# Altium PCB OFP_VIM_v1.5.2.PcbDoc (part 3 of 3)
Units mil, origin at the board's own origin, x right, y up, seen from the top; angles counter-clockwise.
Board outline 4311.02 x 2539.37 mil, 2 copper layers (Top Layer, Bottom Layer), stack 62.256 mil thick; 96 components, 59 nets, 240 pads, 33 vias.
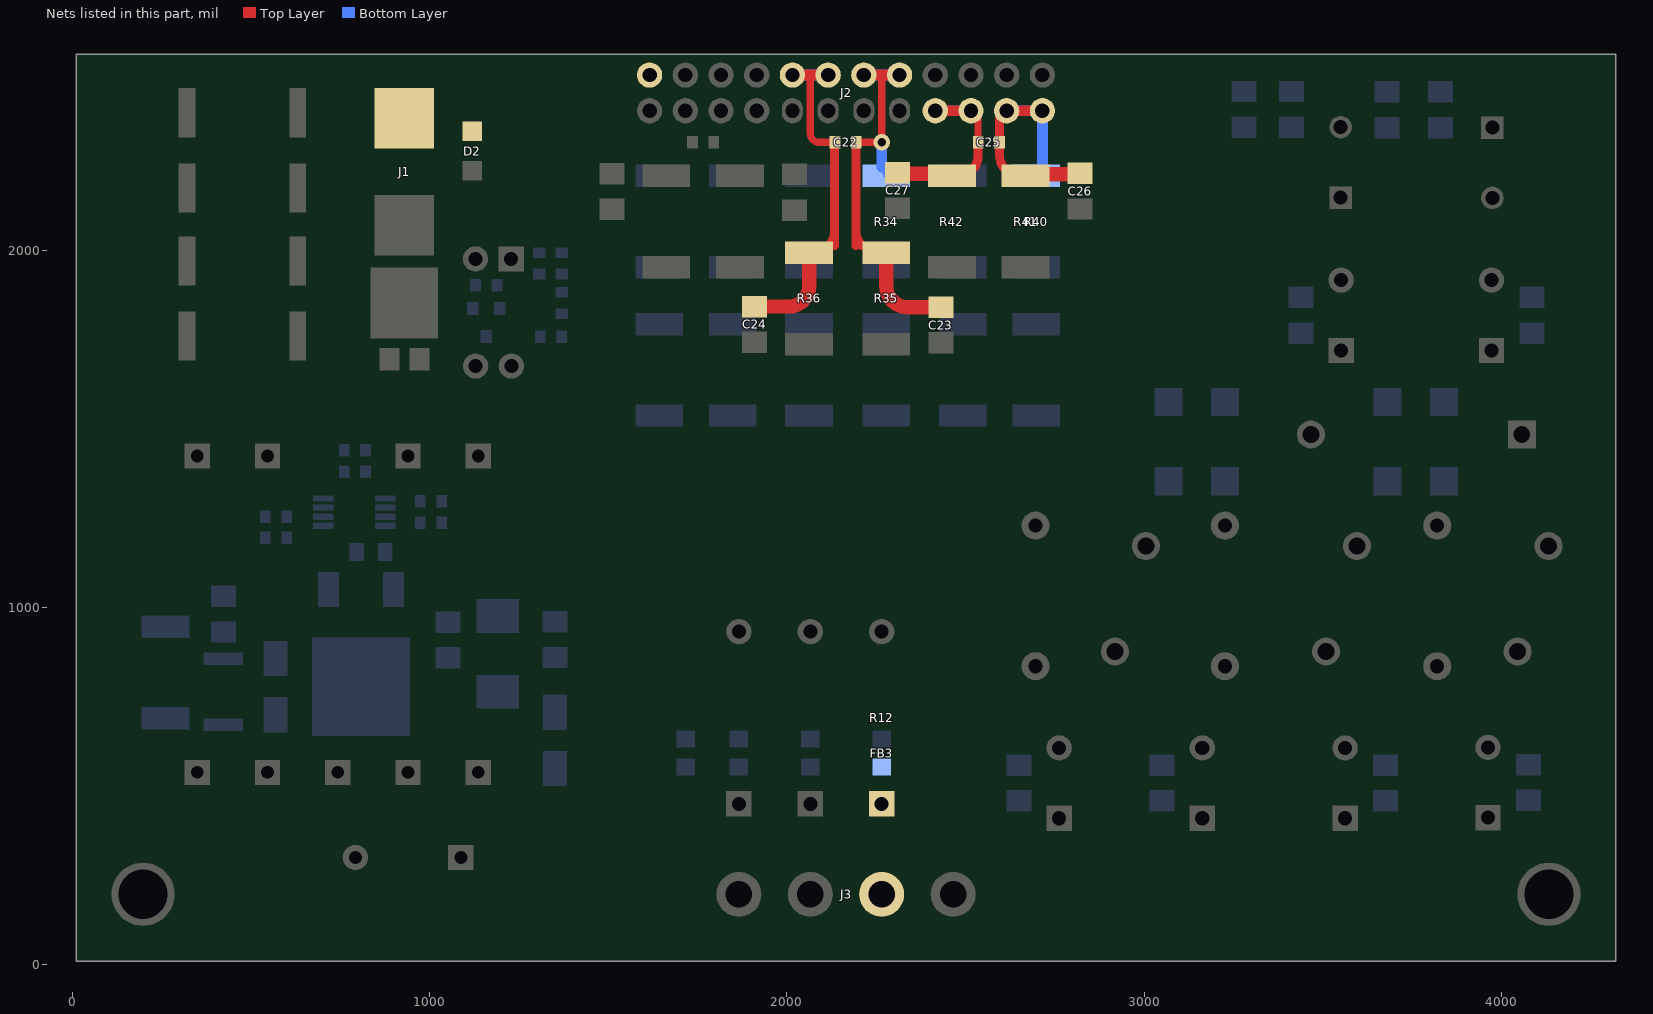
[diagram p2: the nets of this part, all layers, seen from the top]

## Via types
v1: diameter 47.24, hole 23.62, Top Layer to Bottom Layer, 33 vias

## Nets (pads, with @x,y where several pads share a name; then routed paths per layer and width w, separated by ;. In a path a pad name is that pad's centre, name@x,y a point inside that pad or via, vN(x,y) a via of type N, cw(c..) or ccw(c..) an arc to the next point about the centre after c; other vN are vias at no path point) (continued)
VB_N: C22.2 C24.2 J2.13 J2.15 R36.2 | length 1113.1
  Top Layer w20: 2065.35,2490.95 2065.35,2327.58 ccw(c2090.3,2327.58) 2090.3,2302.64 C22.2@2134.36,2302.64
  Top Layer w25: R36.2@2061.19,1996.69 2117.39,2013.77 ccw(c2076.35,2053.77) 2133.65,2053.77 ; 2133.65,2013.77 C22.2@2133.65,2300.93
  Top Layer w30: J2.15@2015.35,2490.95 2065.35,2490.95 J2.13@2115.35,2490.95
  Top Layer w40: C24.2@1909.8,1842.69 2005.78,1842.69 ; 2008.39,1842.75 ccw(c2005.78,1899.07) 2062.16,1899.07 R36.2@2062.16,1993.49
  Bottom Layer w30: J2.15@2015.35,2490.95 J2.13@2115.35,2490.95
VB_P: C22.1 C23.2 J2.9 J2.11 R34.2 R35.2 | length 1227.4
  Top Layer w20: C22.1@2194.36,2302.64 2263.65,2302.64 2264.13,2302.67 cw(c2265.35,2282.71) 2265.35,2302.71 2265.35,2490.95
  Top Layer w25: 2193.65,2013.77 C22.1@2193.65,2300.93 ; 2193.65,2053.77 ccw(c2250.96,2053.77) 2209.92,2013.77 R35.2@2266.85,1996.47
  Top Layer w30: J2.11@2215.35,2490.95 2265.35,2490.95 J2.9@2315.35,2490.95
  Top Layer w40: R35.2@2278.16,1993.49 2278.16,1900 ccw(c2337.31,1900) 2337.31,1840.85 C23.2@2430.83,1840.85
  Bottom Layer w15: R34.2@2265.35,2232.49 R34.2@2278.16,2208.5
  Bottom Layer w30: J2.11@2215.35,2490.95 J2.9@2315.35,2490.95 ; R34.2@2265.35,2232.49 v1(2265.35,2302.64)
VC_INPUT: FB3.1 J3.3 R12.1
VC_N: C25.2 C27.2 J2.6 J2.8 R42.2 | length 586.4
  Top Layer w20: J2.6@2515.35,2390.95 cw(c2515.35,2370.95) 2535.35,2370.95 C25.2@2535.35,2302.65
  Top Layer w25: R42.2@2462.16,2208.5 2519.09,2225.8 ccw(c2478.05,2265.8) 2535.35,2265.8 C25.2@2535.35,2302.65
  Top Layer w30: J2.8@2415.35,2390.95 J2.6@2515.35,2390.95
  Top Layer w40: C27.2@2309.77,2214.78 R42.2@2455.87,2214.78
  Bottom Layer w30: J2.8@2415.35,2390.95 J2.6@2515.35,2390.95
VC_P: C25.1 C26.2 J2.2 J2.4 R40.2 R41.2 | length 885.3
  Top Layer w20: C25.1@2595.35,2302.65 2595.35,2370.95 cw(c2615.35,2370.95) J2.4@2615.35,2390.95
  Top Layer w25: J2.4@2615.35,2390.95 ccw(c2615.35,2370.95) 2595.35,2370.95 2595.35,2265.8 ccw(c2652.66,2265.8) 2611.62,2225.8 R41.2@2668.55,2208.49
  Top Layer w30: J2.4@2615.35,2390.95 J2.2@2715.35,2390.95
  Top Layer w40: R41.2@2674.76,2212.88 C26.2@2820.86,2212.88
  Bottom Layer w30: J2.4@2620,2390.95 J2.2@2715.35,2390.95 ; R40.2@2682.55,2208.49 2715.35,2232.49 J2.2@2715.35,2390.95 ; J2.2@2720,2390.95 J2.2@2715.35,2390.95
VIN+: D2.2 J1.2 J2.23
pads on no net: J2.5 J2.7 J2.10 J2.14 J2.16 J2.17 J2.19 T1.2 T1.6 T1.10

## Polygon pours and split planes (outlines as drawn)
NetBR1_4 on Bottom Layer "NETBR1_4_L02_P053" (solid, pour order 53): 3367.65,1539.84 cw(c3393.87,1539.84) 3393.87,1566.07 3520.48,1566.07 ccw(c3520.48,1591.16) 3545.57,1591.16 3545.57,1602.76 ccw(c3518.33,1602.76) 3518.33,1630 3202.05,1630 ccw(c3202.05,1614.7) 3186.76,1614.7 3186.76,1510 ccw(c3206.21,1510) 3206.21,1490.55 3351.14,1490.55 ccw(c3351.14,1507.06) 3367.65,1507.06
NGND on Bottom Layer "NGND_L02_P051" (solid, pour order 51): 2250.79,2173.86 ccw(c2276.94,2173.86) 2276.94,2147.7 2418.13,2147.7 cw(c2418.13,2116.03) 2449.81,2116.03 2449.81,2044.73 cw(c2419.16,2044.73) 2419.16,2014.09 2179.1,2014.09 cw(c2179.85,2058.78) 2135.16,2059.53 2135.16,2403.16 cw(c2166,2403.16) 2166,2434 2213.64,2434 cw(c2213.64,2396.85) 2250.79,2396.85
NGND on Bottom Layer "NGND_L02_P050" (solid, pour order 50): 2601.25,2531.46 ccw(c2601.25,2510.14) 2579.92,2510.14 2579.92,2476.58 ccw(c2605.08,2476.58) 2605.08,2451.42 2778.58,2451.42 cw(c2778.58,2432.84) 2797.16,2432.84 2797.16,1812.84 ccw(c2816.51,1812.84) 2816.51,1793.49 2867.8,1793.49 ccw(c2867.8,1815.69) 2890,1815.69 2890,2506 ccw(c2864.54,2506) 2864.54,2531.46
GND on Bottom Layer "GND_L02_P044" (solid, pour order 44): 1050.93,1380 ccw(c1050.93,1399.55) 1070.48,1399.55 1070.48,1486.48 cw(c1086,1486.48) 1086,1502 1188.78,1502 cw(c1188.78,1489.43) 1201.35,1489.43 1201.35,1397.65 ccw(c1219.5,1398.15) 1220,1380 1360,1380 ccw(c1360,1406.63) 1386.63,1406.63 1386.63,2150 ccw(c1335.26,2150) 1335.25,2201.38 922.94,2201.38 cw(c922.94,2247.94) 876.38,2247.94 876.38,2262.06 cw(c924.32,2262.06) 924.32,2310 1616.22,2310 ccw(c1616.22,2344.57) 1650.79,2344.57 1650.79,2390.95 ccw(c1615.36,2390.95) 1615.35,2426.38 cw(c1615.35,2469.22) 1585.06,2438.93 1561.87,2462.12 cw(c1615.36,2484.27) 1557.46,2484.27 1557.46,2513.1 cw(c1584.36,2513.1) 1584.36,2540 30,2540 30,666.26 30,366.25 ccw(c66.25,366.25) 66.25,330 397.3,330 cw(c397.3,287.3) 440,287.3 440,236.85 ccw(c480,236.85) 480,196.85 771.26,196.85 ccw(c771.26,243.44) 817.85,243.44 817.85,405.36 ccw(c783.21,405.37) 783.21,440 223.94,440 cw(c223.94,513.65) 150.29,513.65 150.29,1477.14 cw(c203.2,1477.14) 150.35,1479.73 150.36,1500.36 cw(c200,1500.36) 200,1550 856.76,1550 cw(c856.76,1515.63) 891.14,1515.62 891.14,1380
NetC7_2 on Bottom Layer "NETC7_2_L02_P040" (solid, pour order 40): 385.39,963.35 ccw(c385.39,941.82) 363.85,941.82 363.85,794.65 ccw(c383.88,794.65) 383.88,774.63 458,774.63 ccw(c458,794.64) 478,794.64 478,943.53 ccw(c458.18,943.53) 458.18,963.35
NetQ1_3 on Bottom Layer "NETQ1_3_L02_P043" (solid, pour order 43): 1055.12,1099.37 cw(c1055.12,1053.54) 1100.94,1053.54 1100.94,956.64 cw(c1073.36,956.64) 1073.36,929.06 1016,929.06 cw(c1016,947.69) 997.36,947.69 997.36,976.3 ccw(c972.71,976.3) 972.71,1000.95 855,1000.95 cw(c855,1015.95) 840,1015.95 840,1085 cw(c854.37,1085) 854.37,1099.37
NetD4_1 on Bottom Layer "NETD4_1_L02_P042" (solid, pour order 42): 1319.79,891 ccw(c1319.79,868.21) 1297,868.21 1297,669.54 ccw(c1321.54,669.54) 1321.54,645 1427.23,645 ccw(c1427.23,670) 1452.23,670 1452.23,865.06 ccw(c1426.29,865.06) 1426.29,891
NetC13_1 on Bottom Layer "NETC13_1_L02_P041" (solid, pour order 41): 1130.94,929.06 1130.94,1063.7 cw(c1164.85,1063.7) 1164.85,1097.61 1427.39,1097.61 cw(c1427.39,1065) 1460,1065 1460,959.06 cw(c1430,959.05) 1430,929.06 1257.5,929.06
NetC7_1 on Bottom Layer "NETC7_1_L02_P039" (solid, pour order 39): 207.11,1080 ccw(c207.11,1052.89) 180,1052.89 180,900.72 ccw(c210.72,900.72) 210.72,870 309.75,870 ccw(c309.75,893.25) 333,893.25 333,972.19 cw(c360.81,972.19) 360.81,1000 411.05,1000 478.89,1000 cw(c478.89,960.35) 518.53,960.35 518.54,824.68 ccw(c538.2,824.68) 538.2,805.01 596.77,805.01 ccw(c596.78,822.24) 614,822.24 614,1040 ccw(c574,1040) 574,1080
NetD3_2 on Bottom Layer "NETD3_2_L02_P034" (solid, pour order 34): 579.58,775 549.65,775 ccw(c549.65,743.88) 518.54,743.88 518.54,647.18 ccw(c544.54,648) 545.37,622 606,622 cw(c606,599) 629,599 629,514 ccw(c661,514) 661,482 789,482 ccw(c789,512) 819,512 819,577.82 cw(c854.09,577.91) 854,613 938,613 ccw(c938,641) 966,641 966,895.29 ccw(c924.29,895.29) 924.29,937 689,937 ccw(c689,902) 654,902 654,801 cw(c628,801) 628,775
100VDC-623VDC on Bottom Layer "100VDC-623VDC_L02_P038" (solid, pour order 38): 218.66,743.88 ccw(c218.66,705.19) 179.97,705.19 179.97,522.78 ccw(c212.75,522.78) 212.75,490 440,490 ccw(c440,529.76) 479.76,529.76 479.76,710.93 ccw(c446.81,710.93) 446.81,743.88
PGND on Bottom Layer "PGND_L02_P036" (solid, pour order 36): 1264,285.46 cw(c1239.71,285.46) 1239.71,261.17 1062.92,261.17 cw(c1062.92,284.42) 1039.68,284.42 1039.68,601.86 ccw(c1019.43,601.86) 1019.43,622.11 cw(c1021.82,650.12) 1019.06,622.14 cw(c1018.98,644.87) 996.26,644.79 996.26,862.28 cw(c1024.98,862.28) 1024.98,891 1234,891 cw(c1234,861) 1264,861
NetD4_2 on Bottom Layer "NETD4_2_L02_P035" (solid, pour order 35): 896.51,583 ccw(c896.51,553.32) 866.84,553.32 866.84,158.37 ccw(c910.2,158.37) 910.2,115 1417,115 ccw(c1417,153.78) 1455.78,153.78 1455.78,583.8 ccw(c1424.58,583.8) 1424.58,615 1331.04,615 ccw(c1331.04,580.96) 1297,580.96 1297,252 cw(c1267,252) 1267,222 1039.68,222 cw(c1039.68,258.24) 1003.44,258.24 1003.44,553.32 ccw(c973.76,553.32) 973.76,583 921.37,583
NetBR1_1 on Bottom Layer "NETBR1_1_L02_P015" (solid, pour order 15): 3000,1508.37 ccw(c3017.82,1508.37) 3017.82,1490.55 3100.54,1490.55 ccw(c3100.54,1510) 3119.99,1510 3119.5,1590.76 3119.5,1639.5 cw(c3145.43,1639.5) 3145.43,1665.43 3235.71,1665.43 3591.56,1665.43 cw(c3591.56,1637.12) 3619.86,1637.12 3619.86,1549.4 cw(c3596.59,1549.4) 3596.59,1526.12 3427.85,1526.12 ccw(c3427.85,1506.44) 3408.17,1506.44 3408.17,1472.28 ccw(c3435.41,1472.28) 3435.41,1445.04 3682.62,1445.04 ccw(c3682.62,1483.88) 3721.46,1483.88 3721.46,1650.99 3721.46,1766.44 ccw(c3689.76,1766.45) 3689.76,1798.15 3038.15,1798.15 ccw(c3038.14,1760) 3000,1760
NetR10_1 on Bottom Layer "NETR10_1_L02_P026" (solid, pour order 26): 3229.32,2478.06 3229.32,2503.61 cw(c3245.27,2503.61) 3245.27,2519.56 3465.35,2519.56 cw(c3465.35,2505.6) 3479.32,2505.6 3479.32,2429.25 cw(c3462.91,2429.25) 3462.91,2412.85 3246.8,2412.85 cw(c3246.8,2430.33) 3229.32,2430.33
NetC2_2 on Bottom Layer "NETC2_2_L02_P024" (solid, pour order 24): 3357.81,2311.64 3357.81,2295.43 ccw(c3383.11,2295.43) 3383.11,2270.14 3587.05,2270.14 ccw(c3587.05,2290.89) 3607.81,2290.89 3607.81,2350.14 ccw(c3581.09,2350.14) 3581.09,2376.85 3381.51,2376.85 ccw(c3381.51,2353.15) 3357.81,2353.15
NetR4_1 on Bottom Layer "NETR4_1_L02_P023" (solid, pour order 23): 3629.4,2477.06 3629.4,2502.61 cw(c3645.36,2502.61) 3645.36,2518.56 3865.44,2518.56 cw(c3865.44,2504.6) 3879.4,2504.6 3879.4,2428.25 cw(c3863,2428.25) 3863,2411.85 3646.89,2411.85 cw(c3646.89,2429.33) 3629.4,2429.33
NetC2_2 on Bottom Layer "NETC2_2_L02_P022" (solid, pour order 22): 3774.32,2310.64 3774.32,2294.43 ccw(c3799.62,2294.43) 3799.62,2269.13 4003.56,2269.13 ccw(c4003.56,2289.89) 4024.32,2289.89 4024.32,2349.13 ccw(c3997.6,2349.13) 3997.6,2375.85 3798.02,2375.85 ccw(c3798.02,2352.14) 3774.32,2352.14
100VDC-623VDC on Bottom Layer "100VDC-623VDC_L02_P014" (solid, pour order 14): 3367.65,1905.35 3367.65,1858.85 ccw(c3388.35,1858.85) 3388.35,1838.14 3698.14,1838.14 ccw(c3698.14,1861.46) 3721.46,1861.46 3721.46,2367.48 ccw(c3713.09,2367.48) 3713.09,2375.85 3649.38,2375.85 ccw(c3649.38,2366.47) 3640,2366.47 3640,2246.59 cw(c3615.41,2246.58) 3615.41,2222 3519.16,2222 ccw(c3519.16,2193.98) 3491.14,2193.98 3491.14,2006.14 cw(c3457.86,2006.14) 3457.86,1972.86 3393.65,1972.86 ccw(c3393.64,1946.86) 3367.65,1946.86
PGND on Bottom Layer "PGND_L02_P013" (solid, pour order 13): 4064.76,1970.86 cw(c4064.76,1995.62) 4040,1995.62 4040,2192.63 ccw(c4012.63,2192.63) 4012.63,2220 3934.35,2220 ccw(c3934.35,2193) 3907.35,2193 3907.35,1906.16 3907.35,1864.86 ccw(c3934.06,1864.86) 3934.06,1838.14 4133.64,1838.14 ccw(c4133.64,1861.85) 4157.35,1861.85 4157.35,1944.86 ccw(c4131.35,1944.86) 4131.35,1970.86
NetBR1_4 on Bottom Layer "NETBR1_4_L02_P016" (solid, pour order 16): 3907.35,1654.35 cw(c3891,1654.35) 3891,1638 3823.49,1638 ccw(c3823.49,1614.7) 3800.2,1614.7 3800.2,1535.8 ccw(c3816,1535.8) 3816,1520 3971,1520 cw(c3971,1495) 3996,1495 3996,1447 ccw(c4017,1447) 4017,1426 4135,1426 ccw(c4135,1448.35) 4157.35,1448.35 4157.35,1582.84 4157.35,1732.93 4157.35,1774.44 ccw(c4133.64,1774.44) 4133.64,1798.14 3934.06,1798.14 ccw(c3934.06,1771.43) 3907.35,1771.43
NetBR2_3 on Bottom Layer "NETBR2_3_L02_P001" (solid, pour order 1): 2525,1290 ccw(c2525,1247) 2482,1247 2482,575.13 ccw(c2529.1,575.38) 2529.35,528.28 2801.28,528.28 ccw(c2801.29,555) 2828,555 2828,666.47 ccw(c2796.48,666.48) 2796.47,698 2657,698 cw(c2657,746) 2609,746 2609,1050.9 cw(c2647.1,1050.9) 2647.1,1089 2716.36,1089 ccw(c2716.36,1132.64) 2760,1132.64 2760,1257.03 ccw(c2727.03,1257.03) 2727.03,1290
NetBR1_2 on Bottom Layer "NETBR1_2_L02_P006" (solid, pour order 6): 3607,793.89 3607,728.78 ccw(c3641,728.78) 3641,694.78 3723.22,694.78 cw(c3723.22,670.65) 3747.35,670.65 3747.35,551.99 cw(c3723.65,551.99) 3723.64,528.28 3462.63,528.28 cw(c3462.63,557.45) 3433.46,557.46 3433.46,748.13 ccw(c3405.15,748.13) 3405.15,776.44 3178.19,776.44 cw(c3178.19,810.63) 3144,810.63 3144,899.86 cw(c3186.75,899.86) 3186.76,942.62 3557.38,942.62 cw(c3557.39,893) 3607,893
NetL1_1 on Bottom Layer "NETL1_1_L02_P010" (solid, pour order 10): 3924.07,489.86 ccw(c3924.07,463.14) 3897.35,463.14 3897.35,380.54 ccw(c3920.75,380.54) 3920.75,357.14 4121.35,357.14 ccw(c4121.35,383.14) 4147.35,383.14 4147.35,466.15 ccw(c4123.65,466.15) 4123.64,489.86
NetL3_1 on Bottom Layer "NETL3_1_L02_P009" (solid, pour order 9): 3460.18,488.29 ccw(c3460.18,461.57) 3433.46,461.57 3433.46,388.74 ccw(c3466.63,388.74) 3466.63,355.57 3721.35,355.57 ccw(c3721.35,381.57) 3747.35,381.57 3747.35,464.58 ccw(c3723.65,464.58) 3723.64,488.29
NetL5_1 on Bottom Layer "NETL5_1_L02_P008" (solid, pour order 8): 2959.37,488.29 ccw(c2959.37,462.39) 2933.47,462.39 2933.47,389.89 ccw(c2967.8,389.89) 2967.8,355.57 3104.94,355.57 3205.24,355.57 ccw(c3205.24,378.97) 3228.65,378.97 3228.65,461.57 ccw(c3201.93,461.57) 3201.93,488.29
NetBR1_3 on Bottom Layer "NETBR1_3_L02_P007" (solid, pour order 7): 3693.65,811.48 ccw(c3728.69,811.48) 3728.69,776.44 3868.14,776.44 cw(c3868.14,748.86) 3895.72,748.86 3895.72,558.2 ccw(c3924.07,558.2) 3924.07,529.86 4123.64,529.86 ccw(c4123.65,553.56) 4147.35,553.56 4147.35,636.57 4147.35,898.65 ccw(c4103.88,898.65) 4103.88,942.12 3735.49,942.12 ccw(c3735.49,900.28) 3693.65,900.28
NEUTRAL on Bottom Layer "NEUTRAL_L02_P000" (solid, pour order 0): 1670.06,349.66 ccw(c1703.14,349.66) 1703.14,316.58 2352.21,316.58 cw(c2352.21,275.59) 2393.21,275.59 2393.21,112.2 ccw(c2433.97,112.78) 2434.54,72.02 2779.7,72.02 ccw(c2779.69,104.33) 2812,104.33 2812,305.64 2812,455 ccw(c2778.72,455) 2778.72,488.28 2714.54,488.28 2520.28,488.28 ccw(c2520.28,450) 2482,450 2482,392 cw(c2449.07,392) 2449.07,359.07 1789.26,359.07 cw(c1789.26,383.32) 1765,383.32 1765,555 ccw(c1743.38,555) 1743.38,576.62 1690.88,576.62 ccw(c1690.88,555.81) 1670.06,555.81
NetL1_1 on Top Layer "NETL1_1_L01_P058" (solid, pour order 58): 2684.95,331.05 ccw(c2741.29,331.05) 2741.29,274.71 3730.71,274.71 ccw(c3730.71,307.35) 3763.35,307.35 3763.35,379.58 3763.35,475.64 cw(c3796,475.64) 3796,508.29 4021.43,508.29 cw(c4021.43,473.71) 4056,473.71 4056,400 cw(c4019.19,400) 4019.19,363.19 3957.59,363.19 ccw(c3957.59,321.59) 3916,321.59 3916,160 cw(c3872.82,160) 3872.82,116.82 2659.18,116.82 cw(c2659.18,172.05) 2603.95,172.05 2603.95,226.62 ccw(c2510.57,226.62) 2510.57,320 2456,320 cw(c2456,357.79) 2418.21,357.79 2418.21,498.27 ccw(c2376.49,498.27) 2376.48,540 1841.4,540 cw(c1841.4,585.4) 1796,585.4 1796,954.57 cw(c1826,954.57) 1826,984.57 1916,984.57 cw(c1916.01,954.57) 1946,954.57 1946,884.57 1946,670 ccw(c1996,670) 1996,620 2629.26,620 cw(c2629.26,564.31) 2684.95,564.31
GND on Top Layer "GND_L01_P032" (solid, pour order 32): 260.02,1707.65 ccw(c286.69,1707.65) 286.69,1680.98 675.04,1680.98 ccw(c674.99,1709.95) 703.96,1710 703.96,1819.06 ccw(c673.68,1820) 674.62,1850.28 286.69,1850.28 ccw(c286.69,1823.61) 260.02,1823.61
NGND on Top Layer "NGND_L01_P049" (solid, pour order 49): 1479.15,2146.6 ccw(c1479.15,2114.78) 1447.32,2114.78 1447.33,1758.08 ccw(c1499.31,1758.08) 1499.31,1706.09 2329.09,1706.09 2329.09,1769.08 ccw(c2327.34,1769.09) 2327.32,1770.84 2268.34,1770.05 cw(c2278.15,1819.23) 2263.59,1771.24 cw(c2263.59,1806.87) 2227.97,1806.87 2227.97,1898.23 ccw(c2202.23,1898.23) 2202.22,1923.97 2145,1923.97 ccw(c2144.98,1895.72) 2116.73,1895.73 2116.73,1807.43 cw(c2081.99,1807.43) 2081.99,1772.69 1828.21,1772.69 cw(c1828.21,1796.17) 1804.73,1796.18 1804.73,1880.41 cw(c1827.32,1880.41) 1827.33,1903 1915.28,1903 ccw(c1915.29,1922.88) 1935.16,1922.89 1935.16,2034.39 cw(c1955.76,2034.39) 1955.77,2054.99 2056.17,2054.99 ccw(c2056.17,2086.62) 2087.81,2086.63 2087.81,2116.62 ccw(c2057.82,2116.62) 2057.82,2146.6
100VDC-623VDC on Top Layer "100VDC-623VDC_L01_P047" (solid, pour order 47): 259.49,397.83 ccw(c300,397.83) 300,357.32 403.32,357.32 cw(c403.32,320.19) 440,314.42 440,109 ccw(c480,109) 480,69 1599.35,69 ccw(c1599.35,169) 1699.35,169 1699.35,1293.95 cw(c1755.6,1293.95) 1699.42,1296.71 cw(c1736.49,1296.71) 1736.49,1333.78 3313.78,1333.78 ccw(c3313.78,1387.64) 3367.64,1387.64 3367.65,1776.65 cw(c3408.14,1776.65) 3408.14,1817.14 3640,1817.14 ccw(c3640,1847.14) 3670,1847.14 3670,1930.63 ccw(c3636.39,1930.63) 3636.38,1964.24 3455.81,1964.24 3317.69,1964.24 ccw(c3317.69,1890) 3243.45,1890 3243.45,1468.45 cw(c3190,1468.45) 3190,1415 1655.19,1415 ccw(c1655.19,1356.17) 1596.36,1356.17 1596.36,255.36 cw(c1520,255.36) 1520,179 666.85,179 cw(c666.85,220.22) 625.63,220.22 625.63,420.16 ccw(c596.29,420.16) 596.29,449.5 460.68,449.5 cw(c460.68,480.18) 430,480.18 430,490 430,559 ccw(c400,559) 400,589 290,589 ccw(c290,558.49) 259.49,558.49
NetC2_2 on Top Layer "NETC2_2_L01_P017" (solid, pour order 17): 4118.01,2242.81 ccw(c4118.01,2275.21) 4150.41,2275.21 4150.41,2395.31 ccw(c4112.9,2395.31) 4112.9,2432.81 3514.62,2432.81 3454.62,2432.81 ccw(c3454.62,2392.81) 3414.62,2392.81 3414.62,2275.48 ccw(c3447.28,2275.48) 3447.28,2242.81
NetBR1_4 on Top Layer "NETBR1_4_L01_P052" (solid, pour order 52): 3907.35,1765 3790,1765 ccw(c3790,1745) 3770,1745 3770,1660 cw(c3750,1660) 3750,1640 3665,1640 3426.15,1640 ccw(c3426.14,1622.02) 3408.17,1622.02 3408.17,1580.71 ccw(c3428.88,1580.71) 3428.88,1560 3965,1560 cw(c3965,1536.32) 3988.68,1536.32 3988.68,1458.1 ccw(c4014.63,1458.1) 4014.63,1432.15 4127.15,1432.15 ccw(c4127.15,1455.41) 4150.41,1455.41 4150.41,1741.31 ccw(c4126.71,1741.31) 4126.71,1765
NGND on Top Layer "NGND_L01_P048" (solid, pour order 48): 2236.52,2119.53 cw(c2263.99,2119.53) 2263.99,2147 2845.83,2147 cw(c2845.83,2115.83) 2877,2115.83 2877,1752 cw(c2831.09,1752) 2831.09,1706.09 1995.23,1706.09 1995.23,1769.08 cw(c1997.01,1769.08) 1997.01,1770.85 2498,1770.85 ccw(c2498,1792.45) 2519.6,1792.45 2519.6,1880.4 ccw(c2497,1880.4) 2497,1903 2409.05,1903 cw(c2409.04,1922.88) 2389.16,1922.88 2389.16,2034.38 ccw(c2368.56,2034.38) 2368.56,2054.99 2268.16,2054.99 cw(c2268.16,2086.63) 2236.52,2086.63
12V on Top Layer "12V_L01_P028" (solid, pour order 28): 260,1936.69 ccw(c306.69,1936.69) 306.69,1890 715,1890 cw(c715,1845) 760,1845 760,1780.17 ccw(c786.84,1780.17) 786.84,1753.33 885.09,1753.33 cw(c886.75,1751.67) 888.42,1753.33 1024.76,1753.33 ccw(c1024.76,1775.73) 1047.16,1775.73 1047.16,2215.94 ccw(c1019.33,2215.95) 1019.33,2243.78 631.94,2243.78 296.38,2243.78 ccw(c296.38,2207.4) 260,2207.4
NetD1_1 on Top Layer "NETD1_1_L01_P033" (solid, pour order 33): 440,1607.49 cw(c472.51,1607.49) 472.51,1640 727.55,1640 ccw(c727.55,1671.24) 758.79,1671.24 758.79,1691.98 cw(c793.57,1691.98) 793.57,1726.76 940.49,1726.76 1018.31,1726.76 cw(c1018.31,1697.9) 1047.16,1697.9 1047.16,1628.82 1046.98,1589.1 cw(c1017.88,1589.1) 1017.87,1560 719.49,1560 ccw(c719.49,1525.93) 685.42,1525.93 685.42,1383.85 cw(c651.57,1383.85) 651.57,1350 470,1350 cw(c470,1380) 440,1380
GND on Top Layer "GND_L01_P031" (solid, pour order 31): 676,2481.97 cw(c676,2454.02) 703.96,2454.02 703.96,2315.94 cw(c673.68,2315) 674.62,2284.72 298.62,2284.72 cw(c298.62,2323.32) 260.02,2323.32 260.02,2410 260,2454.02 cw(c287.96,2454.02) 287.96,2481.97
VIN+ on Top Layer "VIN+_L01_P029" (solid, pour order 29): 1180,2531.97 832.51,2531.97 ccw(c832.51,2499.47) 800,2499.47 800,2359.66 ccw(c824.94,2359.66) 824.94,2334.72 1460.76,2334.72 ccw(c1460.76,2355.89) 1481.93,2355.89 1481.65,2423.6 1481.65,2437.59 cw(c1499.57,2437.59) 1499.57,2455.51 1615.35,2455.51 ccw(c1615.35,2490.94) 1650.79,2490.94 ccw(c1609.76,2490.95) 1609.76,2531.97
NetL5_1 on Top Layer "NETL5_1_L01_P021" (solid, pour order 21): 3026.81,531.94 ccw(c3050.46,531.94) 3050.46,508.29 3200.82,508.29 cw(c3200.82,480.46) 3228.65,480.46 3228.65,385.79 cw(c3198.43,385.79) 3198.43,355.57 2924.43,355.57 cw(c2924.43,400) 2880,400 2880,640 ccw(c2840,640) 2840,680 2218.7,680 cw(c2218.7,718.7) 2180,718.7 2180,954.57 cw(c2210,954.57) 2210,984.57 2255,984.57 2300,984.57 cw(c2300,954.57) 2330,954.57 2330,806.15 ccw(c2376.15,806.15) 2376.15,760 2985.51,760 cw(c2985.51,718.7) 3026.81,718.7
NetL3_1 on Top Layer "NETL3_1_L01_P018" (solid, pour order 18): 2520,1076.88 2520,1182.69 ccw(c2482.69,1182.69) 2482.69,1220 2040,1220 ccw(c2040,1160) 1980,1160 1980,910 ccw(c2010,910) 2010,880 2100,880 ccw(c2100,909.99) 2130,910 2130,980 2130,1070 cw(c2160,1070) 2160,1100 2354.8,1100 cw(c2354.8,1069.85) 2384.95,1069.85 2384.95,1004.88 ccw(c2429.83,1004.88) 2429.83,960 3282.62,960 cw(c3282.62,922.62) 3320,922.61 3320,663.95 3320,382.69 ccw(c3347.11,382.69) 3347.11,355.57 3610.29,355.57 ccw(c3610.29,375.28) 3630,375.28 3630,485.19 ccw(c3606.91,485.2) 3606.91,508.28 3460,508.29 cw(c3460.9,562.27) 3406.91,563.17 3406.91,1006.28 ccw(c3368.38,1006.28) 3368.38,1044.81 2552.06,1044.81 cw(c2552.06,1076.87)
NetBR2_3 on Top Layer "NETBR2_3_L01_P012" (solid, pour order 12): 4171.67,1290 cw(c4171.67,1261.67) 4200,1261.67 4200,1127.99 cw(c4172.01,1127.99) 4172.01,1100 2661.78,1100 cw(c2661.78,1141.78) 2620,1141.78 2620,1246.93 cw(c2663.07,1246.93) 2663.07,1290

## Other copper
Top Layer:
  rectangle net VA_INPUT: 1829.92,196.85 1900.79,485.43
  rectangle net VB_INPUT: 2029.92,196.85 2100.79,485.43
  rectangle net VC_INPUT: 2229.92,196.85 2300.79,485.43
  rectangle net 12V: 780,1753.33 1029.22,1790
  region net PGND: 410 vertices and 0 holes, not listed, extent 506.92,470 4150.41,2200.45
  region net PGND: 905,1490 904.2,1490 ccw(c904.2,1459.43) 873.63,1459.43 cw(c873.63,1467.95) 865.11,1467.95 865.11,1484.46 cw(c881.07,1484.46) 881.07,1500.42 892.65,1500.42 cw(c892.65,1489.43) 903.63,1489.43
  region net NetD1_1: 790.14,1726.76 ccw(c790.14,1695.4) 758.79,1695.4 ccw(c764.19,1695.4) 764.19,1690 1047.16,1690 1047.16,1701.05 ccw(c1021.46,1701.05) 1021.46,1726.76
Bottom Layer:
  region net NetC14_2: 1136.74,1855.39 1097,1855.39 1097,1807.61 1136.74,1807.61
  rectangle net NetC14_1: 1179.26,1807.61 1219,1855.39
  rectangle net GND: 1066.11,1741.04 1324.13,1790
  rectangle net NetC13_1: 805.41,1270.94 903.16,1288.65
  rectangle net NGND: 2151.68,2130.97 2193.65,2281.64
  region net NetU1_1: 895.23,1345 855.23,1345 855.23,1305.39 895.23,1305.39
  rectangle net NetR18_1: 855,1130 895,1228.61
  rectangle net PGND: 679.08,1180 723.63,1228.61
  rectangle net VC_INPUT: 2240.02,450 2291.98,576.62
  rectangle net VB_INPUT: 2039.37,450 2091.34,576.62
  rectangle net VA_INPUT: 1839.37,450 1891.34,576.62
  region net NGND: 2149.18,2255.96 ccw(c2135.16,2255.96) 2135.16,2269.99 2135.16,2328.84 2154.21,2328.84 cw(c2154.21,2269.99) 2213.06,2269.99 2210.18,2269.99 ccw(c2210.18,2253.46) 2193.65,2253.46 2191.15,2253.76 2191.15,2164.58 ccw(c2208.73,2164.58) 2208.73,2147 2208.73,2119.24 cw(c2202.66,2119.24) 2202.66,2113.17 2150.46,2113.17 cw(c2150.46,2130.97) 2132.66,2130.97 2132.66,2147 ccw(c2132.66,2163.52) 2149.18,2163.52
  region net GND: 891.14,1447.81 891.14,1398.63 ccw(c909.77,1398.63) 909.77,1380 930.5,1380 ccw(c930.5,1424) 974.5,1424 ccw(c950.69,1424) 950.69,1447.81
  region net GND: 1323.63,1737.54 ccw(c1350.13,1737.54) 1350.13,1711.04 1354.13,1711.04 1354.13,1689.21 1309.13,1689.21 1309.13,1737.54 cw(c1312.63,1737.54) 1312.63,1741.04 1324.13,1741.04
  region net NetBR2_2: 2694,944 ccw(c2694,906.58) 2656.58,906.58 2656.58,810.03 ccw(c2690.18,810.03) 2690.18,776.44 2904.04,776.44 cw(c2904.04,747) 2933.47,747 2933.47,633.85 cw(c2932.32,633.85) 2932.32,632.7 2932.32,558.28 2932.32,555.33 2933.47,549.53 2935.74,544.07 2939.02,539.16 2943.2,534.98 2948.11,531.7 2953.57,529.44 2959.37,528.28 2962.32,528.28 3201.93,528.28 3209.52,529.27 3209.72,529.31 3214.59,531.32 3218.96,534.25 3222.68,537.97 3225.61,542.34 3227.62,547.21 3228.65,552.37 3228.65,555 3228.64,600.84 3229.14,672.65 ccw(c3206.78,672.65) 3206.78,695 3096,695 cw(c3096,727) 3064,727 3064,806.19 3064,911.38 3063.29,918.74 3062.92,920.76 3060.59,926.65 3057.16,931.96 3052.76,936.5 3047.56,940.1 3041.76,942.62 3035.57,943.95 3032.41,944

## Silkscreen, mask and mechanical layers (free items; w line width, h text height)
Top Overlay:
  drawing of 38 lines, arcs and shapes, not listed
  text "CAUTION" at 2614.88,1440.13 h120
  text "HIGH VOLTAGE" at 2512.55,1338.4 h120
  text "L3" at 2209.85,303.91 h120
  text "L1" at 1814.85,302.47 h120
  text "L2" at 2010.85,302.47 h120
  text "N" at 2438.85,302.47 h120
  text "OFP_VIM_v1.5" at 3316.8,167.12 h55
Bottom Overlay:
  drawing of 10 lines, arcs and shapes, not listed
  text "CAUTION" at 2232.23,1121.32 h120
  text "HIGH VOLTAGE" at 2334.56,1019.59 h120
Board Outline:
  lines w5: 10.2,10.2 4320.51,10.2
  lines w7.5: 9.84,9.84 4320.87,9.84 4320.87,2549.21 9.84,2549.21 9.84,9.84
Fabrication:
  drawing of 191 lines, arcs and shapes, not listed
  text "Layer" at 5615.34,3070 h60
  text "Name" at 6025.26,3070 h60
  text "Material" at 6955,3070 h60
  text "Thickness" at 7814.77,3070 h60
  text "Constant" at 8464.6,3070 h60
  text "Board Layer Stack" at 9034.46,3070 h60
  text "Top Overlay" at 6025.26,2950 h60
  text "Top Solder" at 6025.26,2830 h60
  text "Solder Resist" at 6955,2830 h60
  text "0.010mm" at 7814.77,2830 h60
  text "3.5" at 8464.6,2830 h60
  text "1" at 5615.34,2710 h60
  text "Top Layer" at 6025.26,2710 h60
  text "0.035mm" at 7814.77,2710 h60
  text "Dielectric 1" at 6025.26,2590 h60
  text "FR-4" at 6955,2590 h60
  text "1.511mm" at 7814.77,2590 h60
  text "4.8" at 8464.6,2590 h60
  text "2" at 5615.34,2470 h60
  text "Bottom Layer" at 6025.26,2470 h60
  text "0.035mm" at 7814.77,2470 h60
  text "Bottom Solder" at 6025.26,2350 h60
  text "Solder Resist" at 6955,2350 h60
  text "0.010mm" at 7814.77,2350 h60
  text "3.5" at 8464.6,2350 h60
  text "Bottom Overlay" at 6025.26,2230 h60
  text "Total board thickness:" at 5615.34,2110 h60
  text "1.602mm" at 7814.77,2110 h60
Drill Drawing:
  circle w10: c210.62,4655.83 r33.33
  circle w10: c210.62,4205.83 r20
  circle w10: c210.62,4205.83 r33.33
  lines w10: 177.29,4389.17 243.96,4389.17 210.62,4322.5 177.29,4389.17 ; 177.29,4472.5 243.96,4472.5 243.96,4539.17 177.29,4539.17 177.29,4472.5 ; 177.29,4772.5 177.29,4789.17 193.96,4805.83 177.29,4822.5 177.29,4839.17 193.96,4839.17 210.62,4822.5 227.29,4839.17 243.96,4839.17 243.96,4822.5 227.29,4805.83 243.96,4789.17 243.96,4772.5 227.29,4772.5 210.62,4789.17 193.96,4772.5 177.29,4772.5 ; 177.29,4922.5 210.62,4939.17 243.96,4922.5 227.29,4955.83 243.96,4989.17 210.62,4972.5 177.29,4989.17 193.96,4955.83 177.29,4922.5 ; 177.29,5089.17 193.96,5089.17 210.62,5072.5 227.29,5089.17 243.96,5089.17 227.29,5105.83 243.96,5122.5 227.29,5122.5 210.62,5139.17 193.96,5122.5 177.29,5122.5 193.96,5105.83 177.29,5089.17 ; 177.29,5255.83 210.62,5222.5 243.96,5255.83 210.62,5289.17 177.29,5255.83
  lines w15: 117.5,4127.5 11258.38,4127.5 ; 117.5,5327.5 11258.38,5327.5 ; 668.38,3977.5 668.38,5477.5 ; 1248.22,3977.5 1248.22,5477.5 ; 2397.89,3977.5 2397.89,5477.5 ; 2903.76,3977.5 2903.76,5477.5 ; 3637.56,3977.5 3637.56,5477.5 ; 5137.12,3977.5 5137.12,5477.5 ; 5726.96,3977.5 5726.96,5477.5 ; 6472.76,3977.5 6472.76,5477.5 ; 7692.4,3977.5 7692.4,5477.5 ; 8546.17,3977.5 8546.17,5477.5 ; 9879.77,3977.5 9879.77,5477.5 ; 117.5,3977.5 11258.38,3977.5 11258.38,5477.5 117.5,5477.5 117.5,3977.5
  text "Symbol" at 207.5,5372.5 h72
  text "Count" at 713.38,5372.5 h72
  text "Hole Size" at 1293.22,5372.5 h72
  text "Plated" at 2442.89,5372.5 h72
  text "Hole Type" at 2948.76,5372.5 h72
  text "Drill Layer Pair" at 3682.56,5372.5 h72
  text "Via/Pad" at 5182.12,5372.5 h72
  text "Pad Shape" at 5771.96,5372.5 h72
  text "Template" at 6517.76,5372.5 h72
  text "Description" at 7737.4,5372.5 h72
  text "Hole Tolerance (+)" at 8591.17,5372.5 h72
  text "Hole Tolerance (-)" at 9924.77,5372.5 h72
  text "2" at 713.38,5222.5 h60
  text "36.22mil (0.920mm)" at 1293.22,5222.5 h60
  text "PTH" at 2442.89,5222.5 h60
  text "Round" at 2948.76,5222.5 h60
  text "Top Layer - Bottom Layer" at 3682.56,5222.5 h60
  text "Pad" at 5182.12,5222.5 h60
  text "(Mixed)" at 5771.96,5222.5 h60
  text "(Mixed)" at 6517.76,5222.5 h60
  text "2" at 713.38,5072.5 h60
  text "137.79mil (3.500mm)" at 1293.22,5072.5 h60
  text "PTH" at 2442.89,5072.5 h60
  text "Round" at 2948.76,5072.5 h60
  text "Top Layer - Bottom Layer" at 3682.56,5072.5 h60
  text "Pad" at 5182.12,5072.5 h60
  text "Rounded" at 5771.96,5072.5 h60
  text "c450h350" at 6517.76,5072.5 h60
  text "4" at 713.38,4922.5 h60
  text "74.80mil (1.900mm)" at 1293.22,4922.5 h60
  text "PTH" at 2442.89,4922.5 h60
  text "Round" at 2948.76,4922.5 h60
  text "Top Layer - Bottom Layer" at 3682.56,4922.5 h60
  text "Pad" at 5182.12,4922.5 h60
  text "Rounded" at 5771.96,4922.5 h60
  text "c320h190m330mx330p0" at 6517.76,4922.5 h60
  text "8" at 713.38,4772.5 h60
  text "47.24mil (1.200mm)" at 1293.22,4772.5 h60
  text "PTH" at 2442.89,4772.5 h60
  text "Round" at 2948.76,4772.5 h60
  text "Top Layer - Bottom Layer" at 3682.56,4772.5 h60
  text "Pad" at 5182.12,4772.5 h60
  text "(Mixed)" at 5771.96,4772.5 h60
  text "(Mixed)" at 6517.76,4772.5 h60
  text "9" at 713.38,4622.5 h60
  text "35.43mil (0.900mm)" at 1293.22,4622.5 h60
  text "PTH" at 2442.89,4622.5 h60
  text "Round" at 2948.76,4622.5 h60
  text "Top Layer - Bottom Layer" at 3682.56,4622.5 h60
  text "Pad" at 5182.12,4622.5 h60
  text "Rectangle" at 5771.96,4622.5 h60
  text "s180h90" at 6517.76,4622.5 h60
  text "24" at 713.38,4472.5 h60
  text "40.16mil (1.020mm)" at 1293.22,4472.5 h60
  text "PTH" at 2442.89,4472.5 h60
  text "Round" at 2948.76,4472.5 h60
  text "Top Layer - Bottom Layer" at 3682.56,4472.5 h60
  text "Pad" at 5182.12,4472.5 h60
  text "Rounded" at 5771.96,4472.5 h60
  text "(Mixed)" at 6517.76,4472.5 h60
  text "32" at 713.38,4322.5 h60
  text "39.37mil (1.000mm)" at 1293.22,4322.5 h60
  text "PTH" at 2442.89,4322.5 h60
  text "Round" at 2948.76,4322.5 h60
  text "Top Layer - Bottom Layer" at 3682.56,4322.5 h60
  text "Pad" at 5182.12,4322.5 h60
  text "(Mixed)" at 5771.96,4322.5 h60
  text "(Mixed)" at 6517.76,4322.5 h60
  text "33" at 713.38,4172.5 h60
  text "23.62mil (0.600mm)" at 1293.22,4172.5 h60
  text "PTH" at 2442.89,4172.5 h60
  text "Round" at 2948.76,4172.5 h60
  text "Top Layer - Bottom Layer" at 3682.56,4172.5 h60
  text "Via" at 5182.12,4172.5 h60
  text "Rounded" at 5771.96,4172.5 h60
  text "v120h60" at 6517.76,4172.5 h60
  text "114 Total" at 713.38,4022.5 h60

## Dimensions
4320.87,2549.21 to 4320.51,10.2 on Dimension
9.84,2549.21 to 4320.87,2549.21 on Dimension

## Text inside footprints (layer, text, board x,y; h text height)
BR1: Bottom Overlay "~" at 3795.83,1401.41 h39.37 r270; Bottom Overlay "~" at 3645.83,1401.41 h39.37 r270; Bottom Overlay "-" at 3857.53,1524.65 h39.37 r90; Bottom Overlay "+" at 3710.05,1524.65 h39.37 r90
BR2: Bottom Overlay "+" at 3096.61,1524.65 h39.37 r90; Bottom Overlay "-" at 3244.09,1524.65 h39.37 r90; Bottom Overlay "~" at 3032.39,1401.41 h39.37 r270; Bottom Overlay "~" at 3182.39,1401.41 h39.37 r270
T1: Top Overlay "Cut 2/3" at 561.55,599.09 h60 r90; Top Overlay "1" at 370.22,593.09 h60 r90; Top Overlay "5" at 1152.55,607.09 h60 r90; Top Overlay "10" at 369.88,1320.05 h60 r90; Top Overlay "6" at 1152.55,1307.09 h60 r90